# Altium PCB Mega2560_Custom.PcbDoc (part 6 of 6)
Units mil, origin at the board's own origin, x right, y up, seen from the top; angles counter-clockwise.
Board outline 4742.41 x 2889.95 mil, 2 copper layers (Top Layer, Bottom Layer), stack 57 mil thick; 215 components, 134 nets, 793 pads, 779 vias.
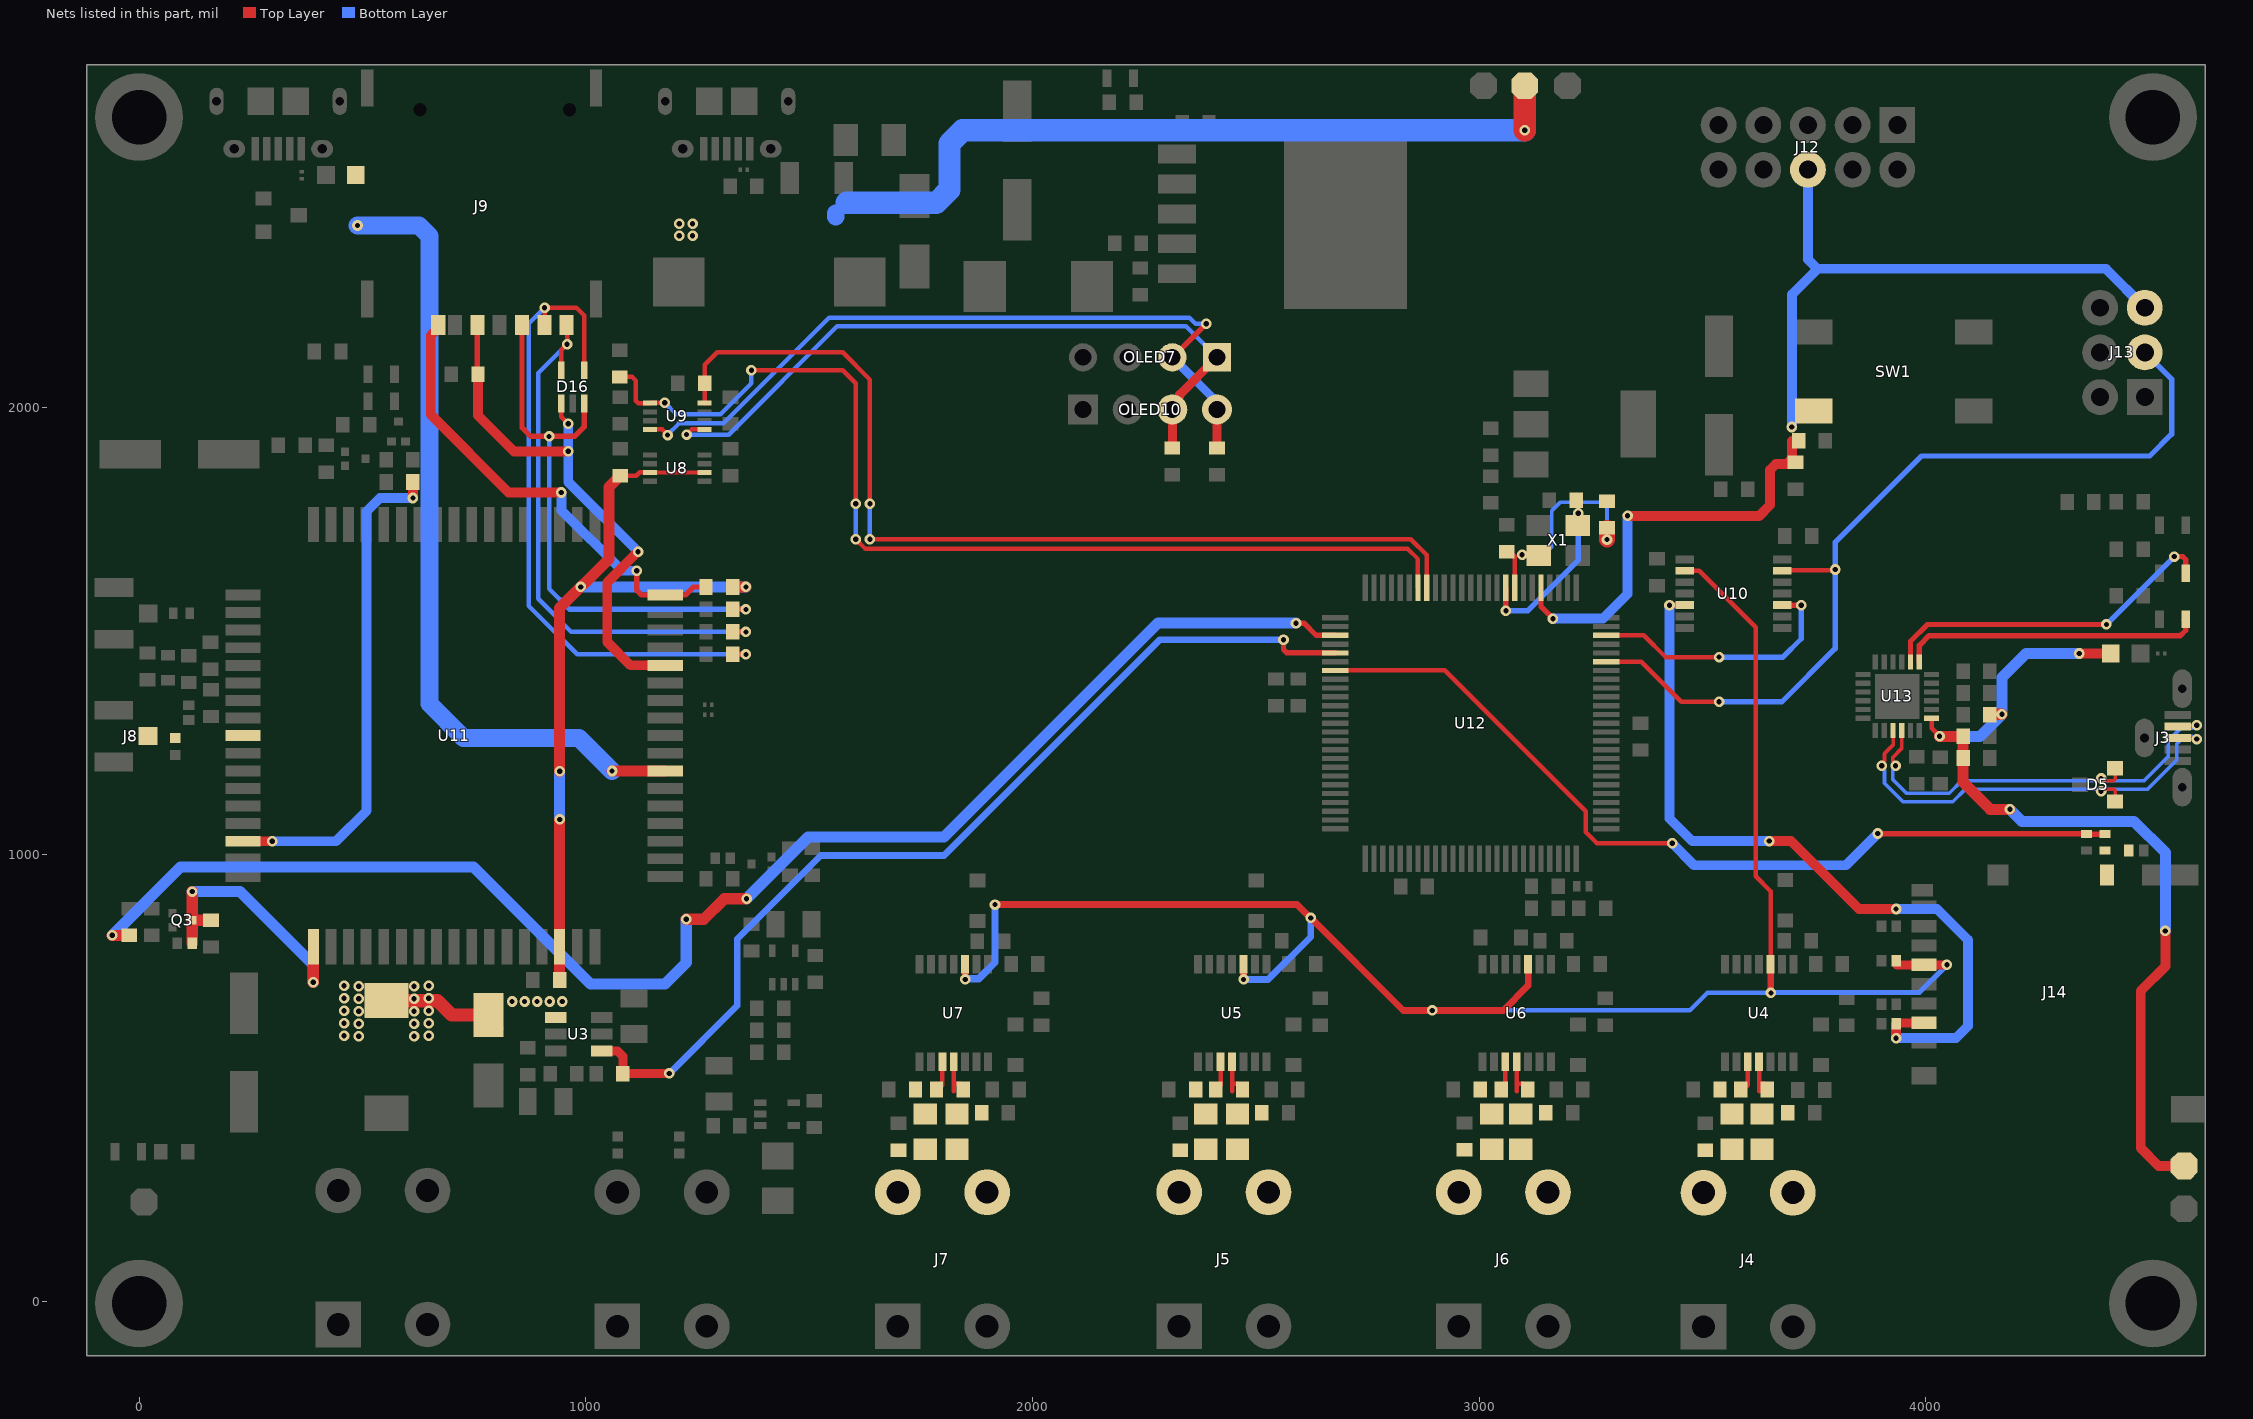
[diagram p3: the nets of this part, all layers, seen from the top]

## Via types
v1: diameter 23.62, hole 11.81, Top Layer to Bottom Layer, 779 vias

## Nets (pads, with @x,y where several pads share a name; then routed paths per layer and width w, separated by ;. In a path a pad name is that pad's centre, name@x,y a point inside that pad or via, vN(x,y) a via of type N, cw(c..) or ccw(c..) an arc to the next point about the centre after c; other vN are vias at no path point) (continued)
PWR12V_EN: R3.2 U3.4 U12.55 | length 2203
  Top Layer w12: v1(2561.82,1480.95) 2561.82,1458.95 2569.49,1451.28 U12.55@2677.67,1451.28
  Top Layer w15: R3.2@1083,509 R3.2@1085,507
  Top Layer w20: U3.4@1035.57,560.6 1035.73,560.44 1070.56,560.44 1083,548 R3.2@1083,509 ; R3.2@1085,507 1088,510 v1(1187,510)
  Bottom Layer w15: v1(1187,510) 1339,662 1339,811 1526,998 1802,998 2284.95,1480.95 v1(2561.82,1480.95)
PWRKEY: C41.2 D20.2 Q3.3 U11.1 | length 615.6
  Top Layer w25: D20.2@119.18,800.95 Q3.3@119.18,853.59 ; v1(119.18,917) 119.18,916.95 Q3.3@119.18,853.59 ; C41.2@161,853 160.95,852.95 Q3.3@119.82,852.95 Q3.3@119.18,853.59 ; v1(390,714) 390.3,714.3 U11.1@390.3,793.55
  Bottom Layer w25: v1(119.18,917) 226,917 390,753 v1(390,714)
PWRKEY_EN: R31.2 U12.53 | length 3350.5
  Top Layer w12: v1(2589.82,1517.95) 2589.9,1517.87 2607.9,1517.87 2635.12,1490.65 U12.53@2677.67,1490.65
  Top Layer w25: v1(-60,819) R31.2@-21.87,819 ; v1(1225,855) 1264,855 1310,901 v1(1360,901)
  Bottom Layer w25: v1(-60,819) 93,972 749,972 1011,710 1177,710 1225,758 v1(1225,855) ; v1(1360,901) 1498,1039 1802,1039 2280.95,1517.95 v1(2589.82,1517.95)
R\E\S\E\T\: C44.2 J12.6 J13.5 R38.1 SW1.3 U12.30 | length 2306.1
  Top Layer w8: U12.30@3138.06,1596.71 U12.30@3138.3,1596.95
  Top Layer w12: U12.30@3138.3,1573.42 3138.3,1554.7 v1(3165,1528)
  Top Layer w22: v1(3332,1758) 3626.87,1758 3651,1782.13 3651,1861.11 3663.89,1874 3688,1874 3699.82,1885.82 C44.2@3699.82,1925.95
  Bottom Layer w22: v1(3165,1528) 3277,1528 3332,1583 v1(3332,1758) ; v1@3699.82,1957 3699.82,2253.95 3756.93,2311.06 ; J12.6@3735.82,2532.95 3735.82,2332.16 3756.93,2311.06 ; J13.5@4489.82,2223.95 4402.71,2311.06 3756.93,2311.06
  other v1: 3699.82,1956.95
RF_ANT: D22.1 J8.1 U11.60
RXLED: LED9.2 U13.13 | length 675.3
  Top Layer w12: U13.13@3985.17,1430.85 3985.17,1468.17 4007,1490 4569.5,1490 4581.53,1502.03 LED9.2@4581.53,1527
  Top Layer w16: LED9.2@4579.69,1525.16 LED9.2@4581.53,1527
SCK: J13.3 U10.13 U12.20 | length 2022.6
  Top Layer w10: U12.20@3283.97,1431.59 3362.41,1431.59 3452.05,1341.95 v1(3536.82,1341.95) ; U10.13@3678.07,1635.13 U10.13@3679.98,1637.04 ; U10.13@3679.98,1636.04 v1@3798.91,1636.04 ; v1@3798.91,1637.04 v1@3800.82,1638.95
  Bottom Layer w12: v1(3536.82,1341.95) 3677.82,1341.95 3796.82,1460.95 3796.82,1698.82 3990,1892 4500.87,1892 4549.82,1940.95 4549.82,2063.95 J13.3@4489.82,2123.95
  other v1: 3796.82,1637.95
SCK_3.3V: D27.1 J14.5 U4.10 U5.10 U6.10 U7.10 U10.2 | length 4226
  Top Layer w10: U10.2@3459.57,1635.13 3492.64,1635.13 3619,1508.77 3619,951 3652.18,917.82 U4.10@3652.18,754.41
  Top Layer w15: U7.10@1849.23,754.41 1849.27,754.37 1849.27,720.35 v1(1849.31,720.31) ; v1(2472.41,720.31) U5.10@2472.41,754.41 ; v1(2623,858) 2830,651 v1(2895,651) 3054,651 3109.45,706.45 U6.10@3109.45,754.41 ; U4.10@3652.18,754.41 3652.59,754 3652.59,690.6 v1(3653,690.19)
  Top Layer w16: v1(1916,888) 1916.19,888.19 2592.17,888.19 2622.36,858 v1(2623,858)
  Top Layer w20: D27.1@3934.74,752.96 J14.5@3995.52,752.97 v1(4046.82,752.95)
  Bottom Layer w10: v1(2895,651) 3471,651 3510.19,690.19 v1(3653,690.19)
  Bottom Layer w12: v1(3653,690.19) 3653.81,691 3984.87,691 v1(4046.82,752.95)
  Bottom Layer w15: v1(2472.41,720.31) 2527.31,720.31 2623,816 v1(2623,858)
  Bottom Layer w16: v1(1849.31,720.31) 1850.77,721.77 1879.77,721.77 1916,758 v1(1916,888)
SCL_3.3V: OLED7.1 OLED10.3 R36.1 U9.5 | length 1606.6
  Top Layer w10: v1(1225.5,1939.95) 1236.97,1951.42 U9.5@1265.85,1951.42
  Top Layer w20: R36.1@2313,1910 OLED10.3@2313,1996 2313,2008.69 2329.38,2025.07 2329.38,2029.37 OLED7.1@2413,2113
  Bottom Layer w10: v1(1225.5,1939.95) 1319.82,1939.95 1562.82,2182.95 2343.05,2182.95 OLED7.1@2413,2113
SCL_5V: R40.1 U9.8 U12.43 | length 2184.2
  Top Layer w10: U9.8@1265.85,2010.48 1265.85,2054.85 R40.1@1266,2055 1266,2096 1294,2124 1575,2124 1636,2063 v1(1636,1785) ; v1(1636,1706) 2815,1706 2847,1706 2882.4,1670.6 U12.43@2882.4,1596.95
  Bottom Layer w10: v1(1636,1706) v1(1636,1785)
SD_CS: U10.10 U12.23 | length 591.4
  Top Layer w10: U12.23@3283.97,1490.65 3368.35,1490.65 3417.05,1441.95 v1(3536.82,1441.95)
  Top Layer w12: U10.10@3678.07,1558.36 v1@3720.41,1558.36
  Bottom Layer w12: v1(3536.82,1441.95) 3679.82,1441.95 3720.82,1482.95 v1(3720.82,1557.95) v1@3720.82,1558
SD_CS_3.3V: D25.1 J14.2 U10.5 | length 1743.4
  Top Layer w12: v1(3425.82,1557.95) 3426.03,1558.15 3459.37,1558.15 U10.5@3459.57,1558.36
  Top Layer w20: D25.1@3938.95,623.05 J14.2@3995.52,623.05
  Top Layer w22: v1(3649,1030) 3698,1030 3850,878 v1(3933,878) ; v1(3933,589) D25.1@3933,619.27
  Bottom Layer w22: v1@3425.82,1557.51 3425.82,1080.81 3476.63,1030 v1(3649,1030) ; v1(3933,589) 4067,589 4094,616 4094,809 4025,878 v1(3933,878)
SD_DET: D29.1 J14.SW-A R47.1
SDA_3.3V: OLED7.2 OLED10.4 R37.1 U9.4 | length 1715.9
  Top Layer w10: U9.4@1143.8,1951.42 1170.85,1951.42 1183,1939.27 v1(1183,1939)
  Top Layer w12: OLED7.2@2313,2113 v1@2388,2188
  Top Layer w20: R37.1@2413,1910 OLED10.4@2413,1996
  Bottom Layer w10: v1(1183,1939) 1183,1939.44 1208.51,1964.95 1307.82,1964.95 1544.82,2201.95 2351.05,2201.95 2365,2188 v1(2389,2188)
  Bottom Layer w20: OLED7.2@2313,2113 2404.02,2021.89 2404.02,2004.98 OLED10.4@2413,1996
SDA_5V: R39.1 U9.1 U12.44 | length 2348.7
  Top Layer w10: R39.1@1076,2069 1104,2069 1112,2061 1112,2016.07 1117.86,2010.21 U9.1@1143.8,2010.21 ; U9.1@1144.27,2010.95 v1(1176.82,2010.95) ; v1(1370.82,2083.95) 1575.05,2083.95 1604,2055 v1(1604,1785) ; v1(1604,1706) 1626,1684 2840,1684 2862.71,1661.29 U12.44@2862.71,1596.95
  Bottom Layer w10: v1(1176.82,2010.95) 1201.82,1985.95 1301.82,1985.95 1370.82,2054.95 v1(1370.82,2083.95) ; v1(1604,1706) v1(1604,1785)
SDMMC_DET: R47.2 R48.1 U12.57 | length 1961.9
  Top Layer w10: U12.57@2677.67,1412.17 2922.97,1412.17 3238.29,1096.85 3238.29,1050.18 3263.53,1024.95 v1(3431.81,1024.95)
  Top Layer w12: v1(3892,1047) 3892.37,1046.63 4357.78,1046.63 4358.96,1045.45 R47.2@4400.96,1045.45
  Bottom Layer w22: v1@3431.5,1025.5 3481.05,975.95 3820.95,975.95 v1(3892,1047)
SIM_CLK: D16.5 J9.C3 R22.1 | length 1231.2
  Top Layer w10: D16.5@945.23,2084.35 945.23,2129.23 v1(958,2142) ; J9.C3@957.13,2185.45 958,2184.58 v1@958,2138.31
  Top Layer w12: R22.1@1329.18,1498.28 v1(1358.38,1498.28)
  Bottom Layer w10: v1(958,2142) 893.82,2077.82 893.82,1572.18 967.72,1498.28 v1(1358.38,1498.28)
SIM_DATA: D16.4 J9.C7 R23.1 | length 1498.7
  Top Layer w10: J9.C7@907.82,2186.15 v1(907.82,2223.95) 979.05,2223.95 996.41,2206.59 D16.4@996.41,2084.35
  Top Layer w12: R23.1@1329.18,1447.95 v1(1358.38,1447.95)
  Bottom Layer w10: v1(907.82,2223.95) 871.82,2187.95 871.82,1556.95 980.82,1447.95 v1(1358.38,1447.95)
SIM_DET: J9.CD R24.2 U11.34 | length 1047.2
  Top Layer w12: v1(1114,1635.31) 1114,1592 1125.05,1580.95 U11.34@1177.7,1580.95 1222.95,1580.95 1240.95,1598.95 R24.2@1269.18,1598.95
  Top Layer w22: J9.CD@669.73,2185.45 669.73,2178.76 653,2162.03 653,1984.7 827.3,1810.4 v1(945.27,1810.4)
  Bottom Layer w22: v1(945.27,1810.4) 945.58,1810.09 945.58,1770.42 1080.69,1635.31 v1(1114,1635.31)
SIM_RST: D16.3 J9.C2 R21.1 | length 1268.2
  Top Layer w12: J9.C2@857.13,2185.45 857.13,1955.64 876.82,1935.95 v1(917.82,1935.95) 974.95,1935.95 996.41,1957.41 D16.3@996.41,2009.55 ; R21.1@1329.18,1548.62 v1(1358.38,1548.62)
  Bottom Layer w10: v1(917.82,1935.95) 917.82,1594.95 942.39,1570.39
  Bottom Layer w12: 942.39,1570.39 964.16,1548.62 v1(1358.38,1548.62)
SIM_VDD: C34.2 D16.1 J9.C1 U11.30 | length 1223.5
  Top Layer w10: C34.2@757.13,2076.64 C34.2@758.82,2074.95 ; D16.1@945.23,2009.55 945.03,2009.34 945.03,1979.74 v1(960.82,1963.95)
  Top Layer w12: C34.2@757.13,2076.64 J9.C1@757.13,2185.45
  Top Layer w22: C34.2@758.82,2074.95 758.82,1982.95 839.32,1902.45 v1(960.82,1902.45) ; v1(1117,1678) 1048,1609 1048,1476 1100.53,1423.47 U11.30@1177.7,1423.47
  Bottom Layer w22: v1(960.82,1963.95) v1(960.82,1902.45) 960.82,1834.18 v1(1117,1678)
STATUS: R29.2 U11.66 | length 1126.9
  Top Layer w22: U11.66@232.82,1029.77 v1(298,1029.77) ; v1(613,1798) R29.2@613,1834
  Bottom Layer w22: v1(298,1029.77) 440.77,1029.77 508.82,1097.82 508.82,1767.82 539,1798 v1(613,1798)
SW_12V: D6.2 L1.2 U3.1 | length 279.7
  Top Layer w30: L1.2@553.82,672.93 668.07,672.93 700.31,640.69 D6.2@781.82,640.69 781.82,628.46 D6.2@800.29,610
  other v1: 492,593 615.65,593 459,594 648.65,594 492,621 615.65,621 459,622 648.65,622 492,649 615.65,649 459,650 648.65,650 835,671 863,671 891,671 919,671 947,671 492,677 615.65,677 459,678 648.65,678 492,705 615.65,705 459,706 648.65,706
TH1_CON+: FB3.1 J4.4 | length 5.1
  Top Layer w40: J4.4@3701.37,243.95 J4.4@3701.57,244.15 ; J4.4@3702.59,247.35 J4.4@3705.99,243.95
TH1_CON-: FB2.1 J4.2 R10.2 | length 17.4
  Top Layer w40: J4.2@3501.37,243.95 J4.2@3502.07,244.65 ; J4.2@3505.99,243.95 J4.2@3517.59,255.55
TH1_T+: C15.2 C17.1 FB3.2 U4.4 | length 91.8
  Top Layer w10: 3626.59,470 U4.4@3626.59,535.91 ; C15.2@3632.45,486.5 3641.73,486.5 3651.73,476.5 C15.2@3651.73,474
TH1_T-: C11.2 C15.1 FB2.2 U4.3 | length 65.7
  Top Layer w10: C15.1@3591.73,474 3601,483.27 U4.3@3601,535.91
TH2_CON+: FB7.1 J6.4
TH2_CON-: FB6.1 J6.2 R16.2
TH2_T+: C25.2 C27.1 FB7.2 U6.4 | length 91.8
  Top Layer w10: 3083.86,470 U6.4@3083.86,535.91 ; 3089.72,486.5 3099,486.5 3109,476.5 C25.2@3109,474
TH2_T-: C23.2 C25.1 FB6.2 U6.3 | length 65.7
  Top Layer w10: C25.1@3049,474 3058.27,483.27 U6.3@3058.27,535.91
TH3_CON+: FB5.1 J5.4 | length 4.8
  Top Layer w40: J5.4@2522.82,247.35 J5.4@2526.22,243.95
TH3_CON-: FB4.1 J5.2 R11.2 | length 16.4
  Top Layer w40: J5.2@2326.22,243.95 J5.2@2337.82,255.55
TH3_T+: C16.2 C18.1 FB5.2 U5.4 | length 91.8
  Top Layer w10: 2446.82,470 U5.4@2446.82,535.91 ; 2452.68,486.5 2461.96,486.5 2471.96,476.5 C16.2@2471.96,474
TH3_T-: C14.2 C16.1 FB4.2 U5.3 | length 65.7
  Top Layer w10: C16.1@2411.96,474 2421.23,483.27 U5.3@2421.23,535.91
TH4_CON+: FB9.1 J7.4 | length 5.1
  Top Layer w40: J7.4@1898.42,243.95 J7.4@1898.62,244.15 ; J7.4@1899.64,247.35 J7.4@1903.04,243.95
TH4_CON-: FB8.1 J7.2 R17.2 | length 17.4
  Top Layer w40: J7.2@1698.42,243.95 J7.2@1699.12,244.65 ; J7.2@1703.04,243.95 J7.2@1714.64,255.55
TH4_T+: C26.2 C28.1 FB9.2 U7.4 | length 91.8
  Top Layer w10: 1823.64,470 U7.4@1823.64,535.91 ; 1829.5,486.5 1838.78,486.5 1848.78,476.5 C26.2@1848.78,474
TH4_T-: C24.2 C26.1 FB8.2 U7.3 | length 65.7
  Top Layer w10: C26.1@1788.78,474 1798.05,483.27 U7.3@1798.05,535.91
TXLED: LED8.2 U13.14 | length 774.2
  Top Layer w12: U13.14@3965.35,1430.72 3965.35,1477.35 4003,1515 v1(4404,1515) ; v1(4556,1667) 4574.5,1667 4581.53,1659.97 LED8.2@4581.53,1630
  Bottom Layer w12: v1(4404,1515) v1(4556,1667)
USB_D_N: D5.2 J3.2 U13.4 | length 982.2
  Top Layer w8: v1@3926.07,1208.54 3926.07,1218.04 3945.32,1237.29 3945.32,1276.83 U13.4@3945.67,1277.18 ; v1@4401.04,1165.5 4420.61,1165.5 4423.37,1168.26 D5.2@4423.37,1193.4 ; J3.2@4563.82,1286.54 4565.08,1287.8 4604.56,1287.8 v1(4605.82,1289.05)
  Bottom Layer w8: v1(3931.89,1198.5) 3931.89,1194.27 3926.07,1188.46 3926.07,1167.25 3956.25,1137.08 4052.24,1137.08 4080.66,1165.5 4379.5,1165.5 4381.32,1167.32 4389.01,1167.32 v1(4392,1170.31) 4394.99,1167.32 4402.68,1167.32 4404.5,1165.5 4488.84,1165.5 4541.91,1218.57 4541.91,1254.35 4570.81,1283.24 4595.78,1283.24 4601.6,1289.05 v1(4605.82,1289.05)
USB_D_P: D5.1 J3.3 U13.3 | length 1013.7
  Top Layer w8: v1@3907.07,1208.54 3907.07,1225.91 3926.32,1245.16 3926.32,1276.83 U13.3@3925.98,1277.18 ; v1@4401.04,1146.5 4420.61,1146.5 4423.37,1143.74 D5.1@4423.37,1118.6 ; J3.3@4563.82,1260.95 4565.08,1259.69 4604.56,1259.69 v1(4605.82,1258.43)
  Bottom Layer w8: v1(3901.26,1198.5) 3901.26,1194.27 3907.07,1188.46 3907.07,1159.38 3948.38,1118.08 4060.11,1118.08 4088.53,1146.5 4379.5,1146.5 4381.32,1144.68 4389.01,1144.68 v1(4392,1141.69) 4394.99,1144.68 4402.68,1144.68 4404.5,1146.5 4496.71,1146.5 4560.91,1210.7 4560.91,1246.48 4578.68,1264.24 4595.78,1264.24 4601.6,1258.43 v1(4605.82,1258.43)
USB_PRGM: C49.1 C50.1 F3.2 P3.1 R42.2 U13.7 | length 2054.6
  Top Layer w10: U13.7@4012.59,1304.74 4012.59,1282.41 v1(4030.5,1264.5)
  Top Layer w22: v1@4342,1449.97 F3.2@4413.36,1449.95 ; 4480.82,694.77 4480.82,342.95 4520.82,302.95 P3.1@4577.82,302.95 ; 4481.31,694.77 4481.62,694.77 4482.36,695.52 4482.36,696.31 4535.82,749.77 v1(4535.82,828.95)
  Top Layer w25: v1(4030.5,1264.5) C49.1@4083,1264.5 C50.1@4083,1216 4083,1162 4144,1101 v1(4188,1101) ; R42.2@4143,1313 4144,1314 v1(4170,1314)
  Bottom Layer w25: v1(4030.5,1264.5) 4120.5,1264.5 v1(4170,1314) 4170,1396 4224,1450 v1(4343,1450) ; v1(4188,1101) 4215,1074 4466,1074 4535.82,1004.18 v1(4535.82,828.95)
USB_VBUS: F2.2 P2.1 U11.24 | length 3560.2
  Top Layer w22: v1(1058.82,1186.95) v1@1058.97,1187.1 ; U11.24@1177.55,1187.1 U11.24@1177.7,1187.25
  Top Layer w25: v1@1058.97,1187.1 U11.24@1177.55,1187.1
  Top Layer w50: v1(3101.82,2620.95) P2.1@3101.82,2720.95
  Bottom Layer w40: v1(489,2408) 626.57,2408 650,2384.57 650,1337.43 726.43,1261 984.77,1261 v1(1058.82,1186.95) ; 1559.5,2427.5 1559.5,2434.5
  Bottom Layer w50: 1584.25,2459 1784.71,2459 1814,2488.29 1814,2591.66 1843.29,2620.95 v1(3101.82,2620.95)
  other v1: 1209.18,2384.95 1239,2384.95 1209.18,2412 1239,2412
VDD_EXT: C29.1 C35.2 R24.1 U8.3 U8.6 U11.15 | length 1776.5
  Top Layer w10: C29.1@1076.82,1847.95 1112.82,1847.95 1120.46,1855.58 1143.32,1855.58 U8.3@1143.8,1855.11 U8.6@1265.85,1855.11
  Top Layer w25: C35.2@941.48,719 U11.15@941.48,793.55 v1(941.48,1078.61) ; v1(941.48,1186.29) 941.48,1551.43 1051.82,1661.77 1051.82,1822.95 1071.82,1842.95 1071.82,1845.45 1074.32,1847.95 C29.1@1076.82,1847.95 ; R24.1@1329.18,1598.95 v1(1358.38,1598.95)
  Bottom Layer w25: v1(941.48,1078.61) v1(941.48,1186.29) ; v1@989.95,1598.95 v1(1358.38,1598.95)
  other v1: 989,1598.95
XTAL1: C42.2 R35.2 U12.34 X1.1 | length 364.9
  Top Layer w12: U12.34@3059.56,1596.95 3059.66,1596.85 3059.66,1546.11 v1(3059.82,1545.95)
  Bottom Layer w12: v1(3059.82,1545.95) 3108.82,1545.95 3222,1659.13 3222,1693 ; 3221.82,1693 v1(3221.82,1763.82)
XTAL2: C43.1 R35.1 U12.33 X1.3 | length 462.2
  Top Layer w10: C43.1@3077,1670 3079.25,1667.75 U12.33@3079.25,1596.95
  Top Layer w35: v1(3286,1705) R35.1@3286,1731
  Bottom Layer w8: v1(3095.82,1670.95) 3144.82,1670.95 3161.82,1687.95 3161.82,1768.82 3182,1789 3272,1789 3286,1775 v1(3286,1705)
pads on no net: J1.2 J1.3 J1.4 J2.4 J3.4 J4.1 J4.3 J5.1 J5.3 J6.1 J6.3 J7.1 J7.3 J9.C6 J9.MH J11.1 J11.3 J12.7 J12.8 J14.1 J14.8 J15.1 J15.3 SW1.2 SW1.4 U3.6 U4.6 U4.13 U5.6 U5.13 U6.6 U6.13 U7.6 U7.13 U10.6 U10. U11.3 U11.4 U11.5 U11.6 U11.7 U11.8 U11.11 U11.12 U11.13 U11.14 U11.19 U11.20 U11.21 U11.22 U11.23 U11.25 U11.26 U11.35 U11.36 U11.37 U11.38 U11.40 U11.41 U11.42 U11.43 U11.44 U11.47 U11.48 U11.49 U11.50 U11.51 U11.67 U11.68 U12.1 U12.4 U12.5 U12.6 U12.7 U12.8 U12.9 U12.12 U12.13 U12.14 U12.15 U12.16 U12.17 U12.18 U12.19 U12.24 U12.25 U12.27 U12.28 U12.29 U12.35 U12.36 U12.37 U12.38 U12.39 U12.40 U12.41 U12.42 U12.47 U12.48 U12.49 U12.50 U12.51 U12.52 U12.58 U12.59 U12.60 U12.63 U12.64 U12.65 U12.66 U12.67 U12.68 U12.69 U12.70 U12.79 U12.82 U12.83 U12.84 U12.85 U12.86 U12.87 U12.88 U12.89 U12.94 U12.95 U13.1 U13.10 U13.11 U13.12 U13.15 U13.16 U13.17 U13.18 U13.19 U13.22 U13.24

## Polygon pours and split planes (outlines as drawn)
GND on Top Layer "GND_L02_P001" (solid, remove dead copper, pour order 4): -16,-23 -16,2670 4527,2670 4527,-23
GND on Bottom Layer "GND_L02_P001" (solid, remove dead copper, pour order 0): -16,-23 -16,2670 4527,2670 4527,-23

## Other copper
Top Layer:
  rectangle net GND: 4460,1044 4612,1216.95
  rectangle net 3.3V: 4334.13,197 4376.13,1028
  rectangle net NetD2_2: 354,2536 377,2607
  rectangle net USB_VBUS: 466,2389 515,2479
  rectangle net ADC0/IN: 1008,186 1122,307
  rectangle net NetD8_2: 3665.77,789 3703.77,870
  region net TH1_CON-: 3596.73,365 3436.73,365 3436.73,187 3596.73,187
  rectangle net TH1_CON+: 3607.73,189 3760.77,365
  rectangle net TH1_T+: 3608.73,395 3706.73,443
  rectangle net TH1_T+: 3621.73,427 3666.73,492
  rectangle net TH1_T-: 3523.95,452 3606.73,493
  rectangle net TH1_T-: 3536.73,394 3596.73,467
  rectangle net 3.3V: 3672.73,451 3730.73,492
  rectangle net NetD10_2: 3693.77,513 3783,559
  rectangle net D\R\D\Y\1\: 3746,574 3844,635
  rectangle net 3.3V: 3693.73,731.5 3769.73,777.5
  region net 3.3V: 3769.73,836 3722.73,836 3722.73,731.5 3769.73,731.5
  region net GND: 3843.95,784 3796.95,784 3796.95,663 3843.95,663
  region net GND: 2041,784 1994,784 1994,663 2041,663
  rectangle net NetD13_2: 1857.82,789 1895.82,870
  region net 3.3V: 1966.78,836 1919.78,836 1919.78,731.5 1966.78,731.5
  rectangle net 3.3V: 1890.78,731.5 1966.78,777.5
  rectangle net D\R\D\Y\4\: 1943,603 2089,636
  rectangle net NetD15_2: 1890.82,513 1978.82,559
  rectangle net 3.3V: 1869.78,451 1927.78,492
  rectangle net TH4_T-: 1733.78,394 1793.78,467
  rectangle net TH4_T-: 1721,452 1803.78,493
  rectangle net TH4_T+: 1818.78,427 1863.78,492
  rectangle net TH4_T+: 1805.78,395 1903.78,443
  rectangle net TH4_CON+: 1804.78,189 1957.82,365
  region net TH4_CON-: 1793.78,365 1633.78,365 1633.78,187 1793.78,187
  region net TH3_CON-: 2416.96,365 2256.96,365 2256.96,187 2416.96,187
  rectangle net TH3_CON+: 2427.96,189 2581,365
  rectangle net TH3_T+: 2428.96,395 2526.96,443
  rectangle net TH3_T+: 2441.96,427 2486.96,492
  rectangle net TH3_T-: 2348.96,452 2426.96,493
  rectangle net TH3_T-: 2356.96,394 2416.96,467
  rectangle net 3.3V: 2492.96,451 2550.96,492
  rectangle net NetD11_2: 2514,513 2602,559
  rectangle net D\R\D\Y\3\: 2526,603 2662,635
  region net GND: 2665,784 2618,784 2618,663 2665,663
  rectangle net 3.3V: 2513.96,731.5 2589.96,777.5
  region net 3.3V: 2589.96,836 2542.96,836 2542.96,731.5 2589.96,731.5
  region net GND: 3302,784 3255,784 3255,663 3302,663
  region net 3.3V: 3227,836 3180,836 3180,731.5 3227,731.5
  rectangle net NetD12_2: 3076,789 3152,836
  rectangle net NetD9_2: 2481,789 2519,870
  rectangle net D\R\D\Y\2\: 3164,603 3300,635
  rectangle net 3.3V: 3151,731.5 3227,777.5
  rectangle net NetD14_2: 3151,513 3239,559
  rectangle net 3.3V: 3130,451 3188,492
  rectangle net TH2_T-: 2994,394 3054,467
  rectangle net TH2_T-: 2986,452 3064,493
  rectangle net TH2_T+: 3079,427 3124,492
  rectangle net TH2_T+: 3066,395 3164,443
  rectangle net 3.3V: 3722.73,794 3853.91,844
  rectangle net TH2_CON+: 3065,189 3207,365
  region net TH2_CON-: 3054,365 2894,365 2894,187 3054,187
  rectangle net NetR55_1: 1459,756 1534,799
  rectangle net 5V: 1263,761 1428,802
  rectangle net GND: 1349,811 1446,875
  region net GND: 929,479 929,332 1041.95,332 1041.95,479
  region net GNSS_ANT: 35,1434 35,1562 -1,1562 -1,1434
  rectangle net NetL3_2: 0,1369.95 82,1410
  region net GND: 114.33,1172.95 114.33,1227.92 -100,1227.92 -100,1172.95
  region net 3.3V: 4375,691 4375,724 3968,724 3968,691
  region net 3.3V: 4370,398 4370,441 3867,441 3867,398
  region net 3.3V: 4613,172 4613,240 4333.96,240 4333.96,172
  rectangle net SCL_3.3V: 2277,1893 2351,2037
  rectangle net SDA_3.3V: 2377,1893 2451,2034
  rectangle net 12V: -30,178 499,303
  rectangle net SIM_DET: 641,2151 686,2210
  rectangle net SIM_VDD: 739,2013 777,2209
  region net 3.3V: 2859,1819 2859,1877 1895,1877 1895,1819
  rectangle net 3.3V: 2790,1844.15 2859,1999
  rectangle net USB_VBUS: 1107.73,2368 1174.73,2535
  region net USB_VBUS: 1117.15,2435.27 1117.15,2368.27 1270.15,2368.27 1270.15,2435.27
  region net GND: 967.44,2289.9 967.44,2234 1047,2234 1047,2289.9
  region net GSM_PWR: 611,2449 543,2449 543,2296 611,2296
  rectangle net GSM_PWR: 968,2298 1094,2431
  rectangle net GSM_PWR: 543,2394 1094,2455
  rectangle net GND: 365.82,2201.95 528,2288
  rectangle net GND: 2065,1948 2158,2163
  rectangle net 3.3V: 2174,1839 2257.18,2152
  rectangle net GND: 3883,503 3906,621
  rectangle net GND: 1000,2615 1192,2674
  rectangle net GND: 4127,1338 4230,1381
  rectangle net ADC1/IN: 1376,437.07 1437,473
  rectangle net 5V: 3335,1207.05 3501,1250.82
  region net 5V: 1544,478 1451,478 1451,422 1544,422
  rectangle net ADC1/IN: 1235,187 1465,262.95
  region net ADC1/IN: 1290,343 1196,343 1196,301 1290,301
  region net ADC1/IN: 1315,187 1315,343 1196,343 1196,187
  region net ADC1: 1301,374 1301,467 1268,467 1268,374
  region net ADC0/IN: 1122,220 1122,344 1051,344 1051,220
  rectangle net 5V: 3236.18,909.05 3377,949
  region net 5VACC: 3204,949 3204,863 3231,863 3231,949
  region net 5V: 3334.05,1250.82 3334.05,1143 3386,1143 3386,1250.82
  region net GND: 3303,2058.95 3030.82,2058.95 3030.82,2020.95 3303,2020.95
  region net GND: 3045,1921 3045,2189 3004.95,2189 3004.95,1921
  rectangle net GND: 1300.18,1830.05 1390,1868.05
  region net GND: 1353.05,1981.82 1353.05,1833 1391.05,1833 1391.05,1981.82
  rectangle net GND: 357,1838 471,1880
  rectangle net NetQ1_1: 357,1892 471,1934
  region net GND: 630,1866 630,1935 586,1935 586,1866
  region net NetQ2_1: 575,1816 575,1934.95 536,1934.95 536,1816
  region net GSM_PWR: 132,1323 132,1378 87,1378 87,1323
  rectangle net NetL3_1: 48,1425.95 130,1463
  rectangle net GSM_PWR: 142,1369 257,1438
  rectangle net GND: 1406.69,983.98 1475,1036
  rectangle net NetQ4_1: 1406.69,936 1524,973.92
  rectangle net GND: 1008,663 1115.69,699
  rectangle net NetQ3_1: -40.54,859 84,899
  rectangle net GND: 10,781 97,847
  rectangle net GNSS_ANT: 7.82,1517 90.82,1562
  region net NetD2_2: 443,2545 398,2545 398,2496 443,2496
  region net NetD2_2: 443,2523 443,2546 356,2546 356,2523
  rectangle net NetD2_2: 357,2525 377,2606
  region net GSM_PWR_EN: 2419,2656 2419,2468 2452,2468 2452,2656
  region net GSM_PWR_EN: 2444,2656 2373,2656 2373,2610 2444,2610
  region net 5V: 2361,2571 2361,2656 2280,2656 2280,2571
  rectangle net 5V: 2280,2544 2408,2590
  rectangle net GSM_PWR: 2080,2212 2264,2283
  rectangle net NetC55_2: 1355,2506 1381,2616
  rectangle net NetD3_2: 4460,1430 4523,1470
  rectangle net NetD3_2: 4521,1302 4595,1322
  rectangle net GND: 4531,1328 4609,1473
  rectangle net NetD7_1: 1525,2228 1782,2385
  rectangle net GND: 2213.82,2711.95 2314.82,2762.95
  rectangle net NetLED2_1: 2125,2660.95 2190.82,2762.95
  region net GSM_PWR: 2313,2705 2212,2705 2212,2661 2313,2661
  rectangle net 5V: 1874,2367 1999,2533
  rectangle net 5V: 1793,2367 1881,2580.52
  rectangle net 5V: 1873,2458 2054,2580.52
  rectangle net GND: 1834,2588.95 2082,2759.95
  rectangle net 5V: 1660,2549 1823,2636
  region net GND: 1945,2110 1945,2335.82 1840,2335.82 1840,2110
  rectangle net NetD7_1: 2099,2338 2158,2385
  region net NetLED9_1: 4535,1503 4535,1597 4470,1597 4470,1503
  rectangle net NetJ13_2: 4327,1977 4439,2078
  rectangle net GND: 3883,603 3915,857
  rectangle net GND: 1254,922 1301,1006
  rectangle net GND: 3900,489.94 3946,565.94
  rectangle net SCK_3.3V: 3923,742.96 3957,776.96
  rectangle net SW_12V: 443,582 816,719
  rectangle net 5V: 406.18,320 703,540
  region net GND: 1195,699 1073,699 1073,637 1195,637
  rectangle net 5V: 1098,551 1179,586
  region net 5V: 1179,627 1073,627 1073,577 1179,577
  region net SW_12V: 961,686 806,686 806,621 961,621
  region net FB_12V: 938,490 938,574 899,574 899,490
  rectangle net GND: 951,409 1042,529
  rectangle net 12V: 718,514 845,542
  rectangle net FB_12V: 852,543 958,574
  rectangle net GND: 4477,926 4612,1060
  rectangle net GSM_PWR: 370,1980 421,2178
  rectangle net GSM_PWR: 210,1943 471,2026
  rectangle net NRESET: 1312,922 1381,1007
  rectangle net USB_PRGM: 4001.82,1253 4051,1311
  rectangle net GND: 1626,2419 1782.65,2541
  rectangle net GND: 3321,1278 3381,1314
  rectangle net 5V: 2523,1279 2615,1350
  rectangle net 5V: 3671,1651.95 3714,1833
  region net NetLED8_1: 4535,1606 4535,1704 4470,1704 4470,1606
  rectangle net CP_VDD: 4404,1558 4443,1703
  rectangle net XTAL2: 3268.5,1715 3303.5,1751
  rectangle net XTAL1: 3192,1771 3307,1814.95
  rectangle net GND: 1183,2475 1350,2542
  rectangle net NetC55_2: 1355,2475 1478,2543
  rectangle net NetF1_2: 1540,2478 1614,2635
  rectangle net 5V: 1056,2112 1229,2210
  rectangle net 5V: 1299,2006 1350,2101
  rectangle net GSM_PWR: 1057,2228 1270,2358.95
  rectangle net USB_VBUS: 466,2474 1123,2542
  rectangle net VDD_EXT: 1039,1813.95 1098.82,1869.95
  rectangle net 3.3V: 3075,1919 3321,2002
  rectangle net 5V: 3004,1831 3253,1907.95
  rectangle net GND: -101,1578 51,2069.71
  rectangle net GND: 96,570 370,683
  rectangle net 12V: 741,483 817,542
  rectangle net 3.3V: 3376.94,1650.95 3484.82,1690
  rectangle net 3.3V: 3339,1798.95 3569,2040
  rectangle net GSM_PWR: 118,1667 186,1794
  rectangle net NetD7_1: 2279,2467 2405,2529
  rectangle net GSM_PWR: 118,1781 272,2027
  rectangle net 3.3V: 4311.82,996.76 4372.82,1027.76
  rectangle net GND: 294,596 370,706
  rectangle net GND: 96,587 319,742.95
  rectangle net GND: 3018,2054 3575.82,2576.95
  rectangle net GND: 2787.82,2186 3049.82,2576.95
  region net GND: -43.18,390.95 -75.18,390.95 -75.18,310.95 -43.18,310.95
  region net NetLED1_1: 68,357 -5.18,357 -5.18,310.95 68,310.95
  rectangle net 5V: 697,313.95 883.82,403
  rectangle net 5V: 1142,2031 1229,2210
  region net GND: 1369.82,1982.95 1302.82,1982.95 1302.82,1944.95 1369.82,1944.95
  rectangle net GND: 4567.82,437.95 4609.82,937.95
  rectangle net GND: 2463.82,2183 2839.82,2691.95
  rectangle net GND: 4460,1192.95 4514.82,1292.95
  rectangle net GND: 3575,1800.95 3633,2075.95
  rectangle net GND: 1010.82,2008.95 1094.82,2039.95
  rectangle net GND: 1009,2008.95 1047,2284
  rectangle net GND: 1000,2652 1849,2709.95
  rectangle net GND: 1183,2531.95 1273.82,2666.95
  rectangle net GND: 153.97,2533.95 268.82,2634.95
  region net GND: 557,2634.95 384.03,2634.95 384.03,2556 557,2556
  rectangle net GND: 153.97,2620.95 557,2709.95
  rectangle net NetLED6_1: 4470,1716 4533,1808
  rectangle net NetJ13_2: 4358,1766 4399,2068
  rectangle net GND: 3472.82,2054.52 3803.82,2427.95
  rectangle net 5V: 3615,1651.95 3700.82,1734.95
  rectangle net XTAL2: 3043.82,1644.95 3161.82,1692.95
  rectangle net GND: 2898,1711.95 3161.21,1816
  rectangle net GND: 3156.82,1763.95 3174.82,1814.95
  rectangle net GND: 3134,1711.95 3174.82,1814.95
  rectangle net XTAL1: 3191.82,1711.95 3247.82,1814.95
  rectangle net R\E\S\E\T\: 3677,1960.95 3801,2022.95
  rectangle net R\E\S\E\T\: 3677,1863 3731.82,1990.95
  rectangle net GND: 3842.82,1087.95 3874.82,1247.95
  rectangle net GND: 3842.82,1134.95 4052.82,1175.95
  rectangle net CP_VDD: 3959.82,1189 4054.82,1239
  rectangle net CP_VDD: 4012.82,1189 4054.82,1237.95
  rectangle net CP_VDD: 3959.82,1190 3991.82,1292.95
  rectangle net GND: 4136.82,909.3 4184.82,934.95
  rectangle net SD_DET: 4387,930.17 4466,1028.98
  rectangle net 5V: 1288.67,1880 1344.82,1926.95
  region net GSM_PWR: 2091,2326 2010,2326 2010,2212 2091,2212
  rectangle net GND: 153.97,2696.95 1850,2759.95
  rectangle net GND: -100.18,1301.95 -13.18,1502.95
  rectangle net GND: 1007.82,663 1064.82,829.95
  rectangle net 12V: 718,415 891.82,525
  rectangle net 12V: 91,224 368.44,540
  rectangle net GND: 573.82,1613.95 639.82,1778.95
  rectangle net GND: 64.82,1050.95 275.82,1240.95
  rectangle net GSM_PWR: 87,1353 181,1410
  rectangle net GSM_PWR: 188,1368.95 318,1480.95
  rectangle net RF_ANT: 12.82,1249.36 272.82,1281.36
  rectangle net NetC39_1: 97,1524.95 272.82,1556.95
  region net NetLED4_2: 599,1959 599,2038.95 560,2038.95 560,1959
  rectangle net GSM_FB: 2218.82,2293.95 2262.82,2356.95
  rectangle net GSM_FB: 2218.82,2336.95 2372.82,2392.95
  pour cut-out: 39,1640 39,1152 -114,1152 -114,1640
  pour cut-out: 1140.46,2213.82 1343.23,2082.71 1480.29,2082.71 1686.46,2216.02 1686.46,2347.29 1485.95,2474.71 1337.54,2474.71 1140.46,2347.29
Bottom Layer:
  rectangle net GSM_PWR: 374,2287 611,2370
  rectangle net GND: 2070,1951 2156,2130
  rectangle net 5V: 2519,1279.95 2750,1353
  rectangle net 3.3V: 2790,1922 3247,1999
  rectangle net 5V: 2976,1802 3310,1910
  rectangle net GND: 2896,1711 2969,1817
  rectangle net 5V: 1870,2431 2406.68,2554.95
  rectangle net 5V: 1870,2522.95 2406.68,2587.95
  rectangle net GND: 1837,2095 2156,2169
  rectangle net SW_12V: 816,621 962,687
  rectangle net SW_12V: 443,582 828.47,719
  rectangle net 5V: 1084,551 1179,627
  rectangle net GND: 4554,966 4613,1023
  rectangle net GND: 308,597.95 349,705
  rectangle net GND: 1000,2620 1273.82,2762.95
  rectangle net GND: 158,2682 465,2719
  rectangle net 5V: 2395,2519 3219,2588
  rectangle net 5V: 2164,2214 2406,2449
  rectangle net USB_VBUS: 1187,2369 1595,2486
  rectangle net GND: 3565,1838.95 3639,2024
  rectangle net 5V: 3605,1651 3714,1740
  rectangle net GND: 3419,2111 3651,2237
  rectangle net GSM_PWR: 116,1667 185,1719
  rectangle net GSM_PWR: 229,1934 469.82,2028
  rectangle net NetD7_1: 1621,2336 2157,2392
  rectangle net 3.3V: 3403,1646 3518,2022
  rectangle net GND: 2853.58,2218 3002,2513
  rectangle net GSM_PWR: 119,1801 236,2028
  rectangle net GND: -81,1788 42,1994
  rectangle net 12V: 147.82,416.95 780.82,540
  rectangle net GND: 4545.82,1312.02 4609.24,1415.95
  rectangle net GND: 4463.82,1312.02 4609.24,1373
  region net GND: 4520.44,1325.58 4463.82,1325.58 4463.82,1217.95 4520.44,1217.95
  rectangle net 5V: 1076,1901 1105.82,2254
  rectangle net 5V: 1080.82,1901 1333.82,1922
  rectangle net GND: 2860.82,2218.95 3292.82,2514
  rectangle net GND: 3008,2115 3293.82,2377.95
  rectangle net GND: 1246.82,2637.95 1683.82,2762.95
  rectangle net GND: 2308.82,2653.95 2839.82,2762.95
  rectangle net 5V: 3741.82,1949.95 3857.82,2030.95
  rectangle net GND: 1627,2654.05 2083,2722
  rectangle net GSM_PWR: 1187,2260 1256,2358.95
  rectangle net GSM_PWR: 1200.82,2260.95 2081,2330
  rectangle net 5V: 1080.82,2047.95 1300.82,2255
  rectangle net GND: 1571,2652 2375,2762.95
  rectangle net GND: 1178,2497 1769,2709.95
  rectangle net 12V: 53.82,184 514,421.95
  rectangle net 5V: 534,313.95 883.82,403.95
  rectangle net 12V: 760,416.95 857,542
  rectangle net GND: 99,597.95 312,743.95
  rectangle net 12V: 53.82,296.95 314.82,540
  rectangle net GSM_PWR: 374,1968.95 469.82,2370
  rectangle net GND: 364.82,1291 414.82,1513.95
  rectangle net GSM_PWR: 99.82,1364.95 318,1483.95
  pour cut-out: 1140.46,2214.82 1343.23,2083.71 1480.29,2083.71 1686.46,2217.02 1686.46,2348.29 1485.95,2475.71 1337.54,2475.71 1140.46,2348.29
  pour cut-out: 405,699 705,699 705,395 405,395
  pour cut-out: 38.82,1641 38.82,1153 -114.18,1153 -114.18,1641

## Silkscreen, mask and mechanical layers (free items; w line width, h text height)
Top Overlay:
  drawing of 88 lines, arcs and shapes, not listed
  text "GSM_PWR" at 2266.12,2709 h55
  text "BOARD" at 1038.89,2588 h39.37
  text "POWER" at 1038.89,2553 h39.37
  text "5V" at 3222.82,2534.42 h60 r90
  text "VBUS" at 3127.82,2523.74 h60 r90
  text "GSM UPDATES" at 83.44,2501 h39.37
  text "GSM_PWR" at 3038.82,2397.7 h60 r90
  text "JTAG" at 3327.82,2354.95 h60
  text "SDA" at 2341.92,2167.96 h55 r90
  text "SCL" at 2441.92,2168.02 h55 r90
  text "NanoSIM" at 505.82,2106.95 h60
  text "Mega2560_v2.1" at -41.93,2094 h60 r90
  text "NETLIGHT" at 245.26,2051 h55
  text "STATUS" at 245.26,1994 h55
  text "RESET" at 3800,1907 h60
  text "ICSP HEADER" at 4241.82,1820.95 h60 r90
  text "SCL" at 2337,1680.74 h60 r90
  text "SDA" at 2438,1680.74 h60 r90
  text "GND" at 2137,1680 h60 r90
  text "3V3" at 2240,1680 h60 r90
  text "GPS" at -110,1625 h55
  text "TRANSMIT" at 4269.42,1609 h50
  text "RECEIVE" at 4305.74,1500 h50
  text "PROG: HEADER" at 4248.83,1322 h60
  text "LTE" at -110,1133.72 h55
  text "D" at 4477,1033 h45
  text "D" at 3887,862 h45
  text "D" at 3889,783 h45
  text "D" at 3858,649 h45
  text "D" at 3857,608 h45
  text "MICRO SD CARD" at 3985.5,365 h60
  text "12V" at 242.32,307.95 h59.06
  text "GND" at 484.82,307.95 h59.06
  text "ADC0" at 867.82,307.95 h59.06
  text "ADC1" at 1224.64,307.95 h59.06
  text "USB_PRGM" at 4233.64,273.95 h60
  text "12V" at -92.11,263 h55
  text "3.3V" at 4391.29,181.95 h60
  text "Note:" at 3927,-52 h60
  text "D >> D25 to D29" at 3921.85,-111.64 h60
  text "-TH2+" at 2751,-116.05 h59.06 r90
  text "-TH4+" at 2051,-117.5 h59.06 r90
  text "-TH3+" at 2128,-117.5 h59.06 r90
  text "-TH1+" at 3853,-117 h59.06 r90
Bottom Overlay:
  drawing of 3075 lines, arcs and shapes, not listed
  text "ZERO CARBON FOOTPRINT" at 2416,1189 h38
Dimension:
  lines w10: 1541.82,372.95 1541.82,1271.45
Board Outline:
  lines w10: -117.18,-122 -117.18,2767.95 4625.23,2767.95 4625.23,-122 -117.18,-122 ; 2263.03,-224.18 2263.03,-224.18
Fabrication:
  drawing of 191 lines, arcs and shapes, not listed
  text "Layer" at 4981.34,2661 h60
  text "Name" at 5391.26,2661 h60
  text "Material" at 6321,2661 h60
  text "Thickness" at 7180.77,2661 h60
  text "Constant" at 7830.6,2661 h60
  text "Board Layer Stack" at 8400.46,2661 h60
  text "Top Overlay" at 5391.26,2541 h60
  text "Top Solder" at 5391.26,2421 h60
  text "Solder Resist" at 6321,2421 h60
  text "3.00mil" at 7180.77,2421 h60
  text "3.5" at 7830.6,2421 h60
  text "1" at 4981.34,2301 h60
  text "Top Layer" at 5391.26,2301 h60
  text "10.00mil" at 7180.77,2301 h60
  text "Dielectric 1" at 5391.26,2181 h60
  text "FR-4" at 6321,2181 h60
  text "37.00mil" at 7180.77,2181 h60
  text "4.8" at 7830.6,2181 h60
  text "2" at 4981.34,2061 h60
  text "Bottom Layer" at 5391.26,2061 h60
  text "10.00mil" at 7180.77,2061 h60
  text "Bottom Solder" at 5391.26,1941 h60
  text "Solder Resist" at 6321,1941 h60
  text "3.00mil" at 7180.77,1941 h60
  text "3.5" at 7830.6,1941 h60
  text "Bottom Overlay" at 5391.26,1821 h60
  text "Total board thickness:" at 4981.34,1701 h60
  text "63.00mil" at 7180.77,1701 h60
Drill Drawing:
  circle w10: c-46.38,4643.27 r33.33
  circle w10: c-46.38,4493.27 r20
  circle w10: c-46.38,4493.27 r33.33
  lines w10: -79.71,3443.27 -46.38,3409.94 -13.04,3443.27 -46.38,3476.61 -79.71,3443.27 ; -79.71,3559.94 -13.04,3559.94 -13.04,3626.61 -79.71,3626.61 -79.71,3559.94 ; -79.71,3709.94 -46.38,3726.61 -13.04,3709.94 -29.71,3743.27 -13.04,3776.61 -46.38,3759.94 -79.71,3776.61 -63.04,3743.27 -79.71,3709.94 ; -79.71,3859.94 -79.71,3876.61 -63.04,3893.27 -79.71,3909.94 -79.71,3926.61 -63.04,3926.61 -46.38,3909.94 -29.71,3926.61 -13.04,3926.61 -13.04,3909.94 -29.71,3893.27 -13.04,3876.61 -13.04,3859.94 -29.71,3859.94 -46.38,3876.61 -63.04,3859.94 -79.71,3859.94 ; -79.71,4026.61 -63.04,4026.61 -46.38,4009.94 -29.71,4026.61 -13.04,4026.61 -29.71,4043.27 -13.04,4059.94 -29.71,4059.94 -46.38,4076.61 -63.04,4059.94 -79.71,4059.94 -63.04,4043.27 -79.71,4026.61 ; -79.71,4226.61 -13.04,4226.61 -46.38,4159.94 -79.71,4226.61 ; -79.71,4376.61 -13.04,4376.61 -46.38,4309.94 -79.71,4376.61 ; -79.71,4759.94 -13.04,4759.94 -13.04,4826.61 -79.71,4826.61 -79.71,4759.94 ; -66.38,4363.27 -26.38,4363.27 -46.38,4323.27 -66.38,4363.27 ; -66.38,4773.27 -26.38,4773.27 -26.38,4813.27 -66.38,4813.27 -66.38,4773.27
  lines w15: -139.5,3364.94 9917.69,3364.94 ; -139.5,4864.94 9917.69,4864.94 ; 411.38,3214.94 411.38,5014.94 ; 1011.22,3214.94 1011.22,5014.94 ; 2150.88,3214.94 2150.88,5014.94 ; 2656.76,3214.94 2656.76,5014.94 ; 3390.56,3214.94 3390.56,5014.94 ; 4890.11,3214.94 4890.11,5014.94 ; 5479.96,3214.94 5479.96,5014.94 ; 6225.76,3214.94 6225.76,5014.94 ; 7415.41,3214.94 7415.41,5014.94 ; 8515.09,3214.94 8515.09,5014.94 ; -139.5,3214.94 9917.69,3214.94 9917.69,5014.94 -139.5,5014.94 -139.5,3214.94
  text "Symbol" at -49.5,4909.94 h72
  text "Count" at 456.38,4909.94 h72
  text "Hole Size" at 1056.22,4909.94 h72
  text "Plated" at 2195.88,4909.94 h72
  text "Hole Type" at 2701.76,4909.94 h72
  text "Drill Layer Pair" at 3435.56,4909.94 h72
  text "Via/Pad" at 4935.11,4909.94 h72
  text "Pad Shape" at 5524.96,4909.94 h72
  text "Template" at 6270.76,4909.94 h72
  text "Hole Length" at 7460.41,4909.94 h72
  text "Routed Path Length" at 8560.09,4909.94 h72
  text "779" at 456.38,4759.94 h60
  text "11.81mil (0.300mm)" at 1056.22,4759.94 h60
  text "PTH" at 2195.88,4759.94 h60
  text "Round" at 2701.76,4759.94 h60
  text "Top Layer - Bottom Layer" at 3435.56,4759.94 h60
  text "Via" at 4935.11,4759.94 h60
  text "Rounded" at 5524.96,4759.94 h60
  text "v60h30" at 6270.76,4759.94 h60
  text "-" at 7460.41,4759.94 h60
  text "-" at 8560.09,4759.94 h60
  text "4" at 456.38,4609.94 h60
  text "19.69mil (0.500mm)" at 1056.22,4609.94 h60
  text "PTH" at 2195.88,4609.94 h60
  text "Slot" at 2701.76,4609.94 h60
  text "Top Layer - Bottom Layer" at 3435.56,4609.94 h60
  text "Pad" at 4935.11,4609.94 h60
  text "Rounded" at 5524.96,4609.94 h60
  text "r80_155h50_115r100" at 6270.76,4609.94 h60
  text "45.28mil (1.150mm)" at 7460.41,4609.94 h60
  text "25.59mil (0.650mm)" at 8560.09,4609.94 h60
  text "2" at 456.38,4459.94 h60
  text "19.69mil (0.500mm)" at 1056.22,4459.94 h60
  text "PTH" at 2195.88,4459.94 h60
  text "Slot" at 2701.76,4459.94 h60
  text "Top Layer - Bottom Layer" at 3435.56,4459.94 h60
  text "Pad" at 4935.11,4459.94 h60
  text "Rounded" at 5524.96,4459.94 h60
  text "r220_110h50_120r100" at 6270.76,4459.94 h60
  text "47.24mil (1.200mm)" at 7460.41,4459.94 h60
  text "27.56mil (0.700mm)" at 8560.09,4459.94 h60
  text "1" at 456.38,4309.94 h60
  text "19.69mil (0.500mm)" at 1056.22,4309.94 h60
  text "PTH" at 2195.88,4309.94 h60
  text "Slot" at 2701.76,4309.94 h60
  text "Top Layer - Bottom Layer" at 3435.56,4309.94 h60
  text "Pad" at 4935.11,4309.94 h60
  text "Rounded" at 5524.96,4309.94 h60
  text "r220_110h50_160r100" at 6270.76,4309.94 h60
  text "62.99mil (1.600mm)" at 7460.41,4309.94 h60
  text "43.31mil (1.100mm)" at 8560.09,4309.94 h60
  text "4" at 456.38,4159.94 h60
  text "21.65mil (0.550mm)" at 1056.22,4159.94 h60
  text "PTH" at 2195.88,4159.94 h60
  text "Slot" at 2701.76,4159.94 h60
  text "Top Layer - Bottom Layer" at 3435.56,4159.94 h60
  text "Pad" at 4935.11,4159.94 h60
  text "Rounded" at 5524.96,4159.94 h60
  text "r100_125h55_85r100" at 6270.76,4159.94 h60
  text "33.47mil (0.850mm)" at 7460.41,4159.94 h60
  text "11.81mil (0.300mm)" at 8560.09,4159.94 h60
  text "2" at 456.38,4009.94 h60
  text "29.53mil (0.750mm)" at 1056.22,4009.94 h60
  text "NPTH" at 2195.88,4009.94 h60
  text "Round" at 2701.76,4009.94 h60
  text "Top Layer - Bottom Layer" at 3435.56,4009.94 h60
  text "Pad" at 4935.11,4009.94 h60
  text "Rectangle" at 5524.96,4009.94 h60
  text "s0hn75" at 6270.76,4009.94 h60
  text "-" at 7460.41,4009.94 h60
  text "-" at 8560.09,4009.94 h60
  text "8" at 456.38,3859.94 h60
  text "37.40mil (0.950mm)" at 1056.22,3859.94 h60
  text "PTH" at 2195.88,3859.94 h60
  text "Round" at 2701.76,3859.94 h60
  text "Top Layer - Bottom Layer" at 3435.56,3859.94 h60
  text "Pad" at 4935.11,3859.94 h60
  text "(Mixed)" at 5524.96,3859.94 h60
  text "(Mixed)" at 6270.76,3859.94 h60
  text "-" at 7460.41,3859.94 h60
  text "-" at 8560.09,3859.94 h60
  text "16" at 456.38,3709.94 h60
  text "40.16mil (1.020mm)" at 1056.22,3709.94 h60
  text "PTH" at 2195.88,3709.94 h60
  text "Round" at 2701.76,3709.94 h60
  text "Top Layer - Bottom Layer" at 3435.56,3709.94 h60
  text "Pad" at 4935.11,3709.94 h60
  text "(Mixed)" at 5524.96,3709.94 h60
  text "(Mixed)" at 6270.76,3709.94 h60
  text "-" at 7460.41,3709.94 h60
  text "-" at 8560.09,3709.94 h60
  text "24" at 456.38,3559.94 h60
  text "51.18mil (1.300mm)" at 1056.22,3559.94 h60
  text "PTH" at 2195.88,3559.94 h60
  text "Round" at 2701.76,3559.94 h60
  text "Top Layer - Bottom Layer" at 3435.56,3559.94 h60
  text "Pad" at 4935.11,3559.94 h60
  text "(Mixed)" at 5524.96,3559.94 h60
  text "(Mixed)" at 6270.76,3559.94 h60
  text "-" at 7460.41,3559.94 h60
  text "-" at 8560.09,3559.94 h60
  text "4" at 456.38,3409.94 h60
  text "122.05mil (3.100mm)" at 1056.22,3409.94 h60
  text "PTH" at 2195.88,3409.94 h60
  text "Round" at 2701.76,3409.94 h60
  text "Top Layer - Bottom Layer" at 3435.56,3409.94 h60
  text "Pad" at 4935.11,3409.94 h60
  text "Rounded" at 5524.96,3409.94 h60
  text "c500h310" at 6270.76,3409.94 h60
  text "-" at 7460.41,3409.94 h60
  text "-" at 8560.09,3409.94 h60
  text "844 Total" at 456.38,3259.94 h60
  text "Slot definitions :" at -49.5,3114.97 h60
  text "Routed Path Length" at 983.19,3114.97 h60
  text "= Calculated from tool start centre position to tool end centre position." at 2085.86,3114.97 h60
  text "Hole Length" at 983.19,3014.99 h60
  text "= Routed Path Length + Tool Size = Slot length as defined in the PCB layout" at 1675.99,3014.99 h60

## Dimensions
-117.18,-122 to -117.18,2767.95 on Dimension
4625.23,-122 to -117.18,-122 on Dimension

## Text inside footprints (layer, text, board x,y; h text height)
J1: Top Overlay "Board Edge" at 1217,2736.56 h19.68
J2: Top Overlay "Board Edge" at 404.88,2751.69 h19.68 r180
J4: Top Overlay "PCB Edge" at 3317,-67.75 h15.75
J5: Top Overlay "PCB Edge" at 2143.22,-66.8 h15.75
J6: Top Overlay "PCB Edge" at 2769.02,-66.8 h15.75
J7: Top Overlay "PCB Edge" at 1513.42,-66.8 h15.75
J9: Top Overlay "Board Edge" at 921.97,2719.81 h30 r180
J11: Top Overlay "PCB Edge" at 885.62,-66.8 h15.75
J15: Top Overlay "PCB Edge" at 260.82,-62.8 h15.75